# Altium PCB TuringSMD_FRONT.PcbDoc
Units mil, origin at the board's own origin, x right, y up, seen from the top; angles counter-clockwise.
Board outline 1181.1 x 5059.06 mil, 2 copper layers (Top Layer, Bottom Layer); 26 components, 85 nets, 86 pads, 19 vias.
Unrouted connection lines stored in the file: 1.
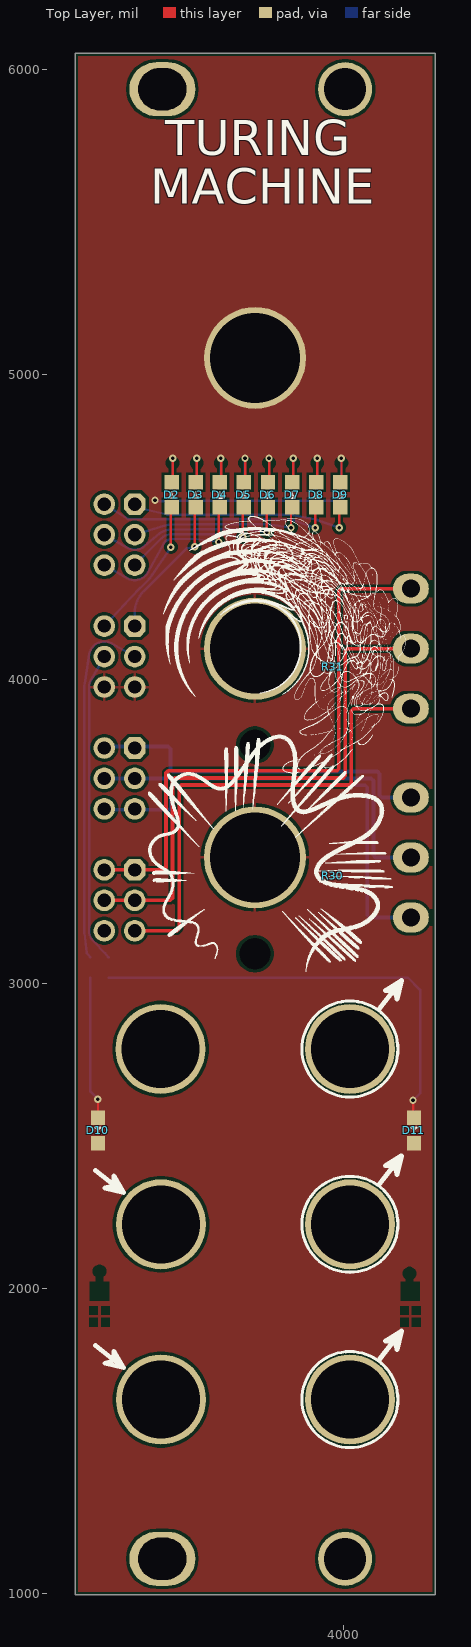
[diagram p0: Top Layer view]
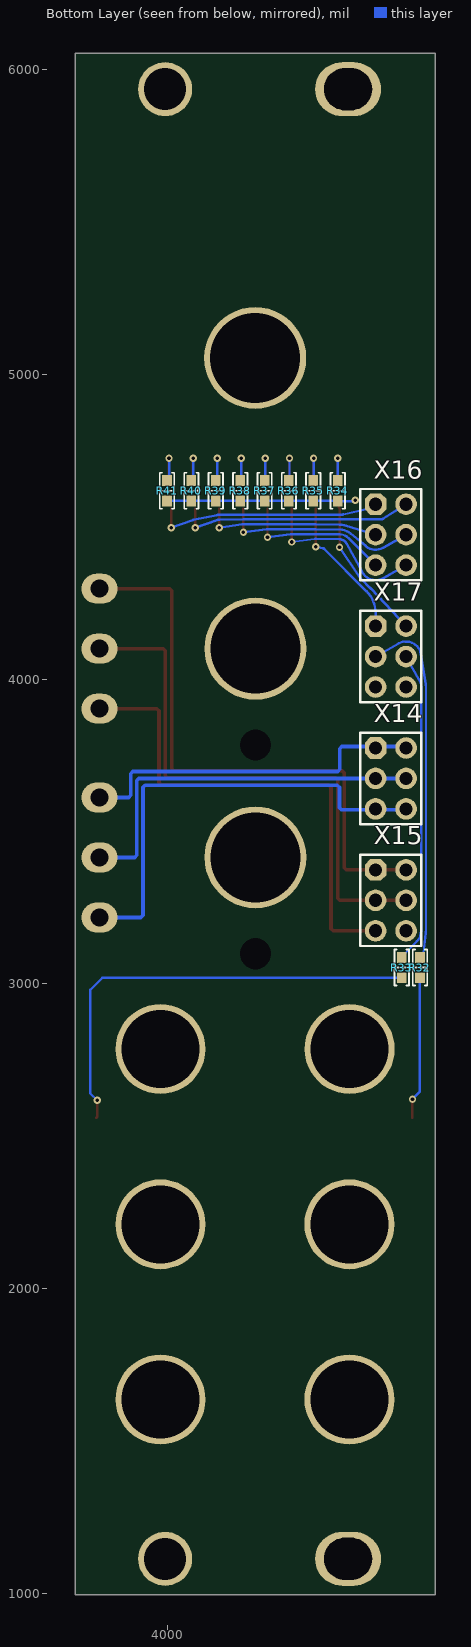
[diagram p1: Bottom Layer view, seen from below]
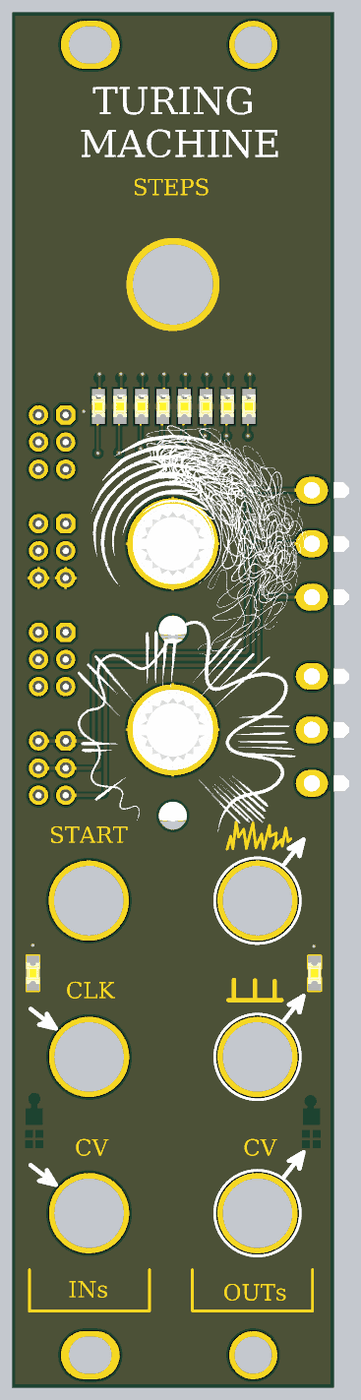
[diagram p2: 3D render of the assembled board from above, using the file's embedded part models]
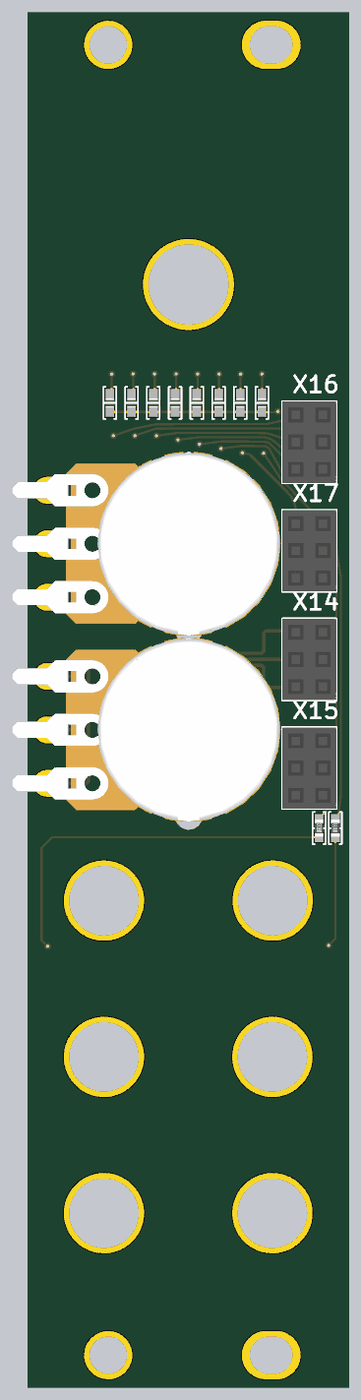
[diagram p3: 3D render of the assembled board from below, using the file's embedded part models]

## Layer stack, top to bottom
Top Solder: solder mask 0.4, Solder Resist, Dk 3.5
Top Layer: signal copper 1.4
Dielectric 1: dielectric 12.6, FR-4, Dk 4.8
Bottom Layer: signal copper 1.4
Bottom Solder: solder mask 0.4, Solder Resist, Dk 3.5

## Board outline
3120.25,995.25 4301.35,995.25 4301.35,6054.31 3120.25,6054.31

## Design rules (kind name [scope] priority, off if disabled: settings)
BoardOutlineClearance [All] p1: gap=10 ignorepadtopadclearanceinfootprint=FALSE except(0: Arc-SplitContinuation Track-SplitContinuation SMDPad-SplitContinuation THPad-SplitContinuation Via-SplitContinuation Fill-SplitContinuation Poly-SplitContinuation Region-SplitContinuation Text-SplitContinuation)
Clearance [All] p1: gap=10 ignorepadtopadclearanceinfootprint=FALSE except(8: Arc-Arc Arc-Track Arc-SMDPad Arc-Fill Arc-Poly Arc-Region Track-Track Track-SMDPad Track-Fill Track-Poly Track-Region SMDPad-SMDPad SMDPad-Fill SMDPad-Poly SMDPad-Region)
PolygonConnect [All] p1: thpad.connectstyle=Relief thpad.reliefconductorwidth=10 thpad.reliefentries=4 thpad.polygonreliefangle="90 Angle" thpad.airgapwidth=10 smdpad.connectstyle=Relief smdpad.reliefconductorwidth=10 smdpad.reliefentries=4 smdpad.polygonreliefangle="90 Angle" smdpad.airgapwidth=10 via.connectstyle=Direct via.reliefconductorwidth=10 via.reliefentries=4 via.polygonreliefangle="90 Angle" via.airgapwidth=10
RoutingVias [All] p1: holewidth=12 width=24 viastyle="Through Hole" minholewidth=12 minwidth=24 maxholewidth=12 maxwidth=24
SolderMaskExpansion [All] p1: expansion=4 istentingtop=FALSE
Width [All] p1: maxlimit=25 minlimit=8 preferedwidth=8
30 further rules are at their usual default settings.

## Components (designator, comment, footprint, x,y, rotation, side; value= is the part's Value field where it differs from the comment)
D2 "Yellow" "LED 0805_2012 YELLOW" 3436.54,4605 r90 top
D3 "Yellow" "LED 0805_2012 YELLOW" 3515.6,4605 r90 top
D4 "Yellow" "LED 0805_2012 YELLOW" 3594.67,4605 r90 top
D5 "Yellow" "LED 0805_2012 YELLOW" 3673.73,4605 r90 top
D6 "Yellow" "LED 0805_2012 YELLOW" 3752.8,4605 r90 top
D7 "Yellow" "LED 0805_2012 YELLOW" 3831.87,4605 r90 top
D8 "Yellow" "LED 0805_2012 YELLOW" 3910.93,4605 r90 top
D9 "Yellow" "LED 0805_2012 YELLOW" 3990,4605 r90 top
D10 "Yellow" "LED 0805_2012 YELLOW" 3195,2519 r270 top
D11 "Yellow" "LED 0805_2012 YELLOW" 4232,2519 r270 top
R30 "POT Ali" POT_ALI 3710,3415 r0 top
R31 "POT Ali" POT_ALI 3710,4100 r0 top
R32 "2.2 kOhms" "YAGEO RES 0603_1608" 3170,3053.46 r90 bottom
R33 "2.2 kOhms" "YAGEO RES 0603_1608" 3230,3053.46 r90 bottom
R34 "2.2 kOhms" "YAGEO RES 0603_1608" 3440,4618.46 r90 bottom
R35 "2.2 kOhms" "YAGEO RES 0603_1608" 3520,4618.46 r90 bottom
R36 "2.2 kOhms" "YAGEO RES 0603_1608" 3600,4618.46 r90 bottom
R37 "2.2 kOhms" "YAGEO RES 0603_1608" 3680,4618.46 r90 bottom
R38 "2.2 kOhms" "YAGEO RES 0603_1608" 3760,4618.46 r90 bottom
R39 "2.2 kOhms" "YAGEO RES 0603_1608" 3840,4618.46 r90 bottom
R40 "2.2 kOhms" "YAGEO RES 0603_1608" 3920,4618.46 r90 bottom
R41 "2.2 kOhms" "YAGEO RES 0603_1608" 4000,4618.46 r90 bottom
X14 "Connector, 6pin, 2.54mm, 500VAC, 3A" "CON: PBD-6" 3265.6,3674.27 r270 bottom
X15 "Connector, 6pin, 2.54mm, 500VAC, 3A" "CON: PBD-6" 3265.6,3274.27 r270 bottom
X16 "Connector, 6pin, 2.54mm, 500VAC, 3A" "CON: PBD-6" 3265.6,4474.27 r270 bottom
X17 "Connector, 6pin, 2.54mm, 500VAC, 3A" "CON: PBD-6" 3265.6,4074.27 r270 bottom

## Footprints (in the part's own frame and the unit in brackets; to place one, negate y for a bottom-side part, rotate by r counter-clockwise, add the part's x,y. Pads: shape width x height; smd on the part's side, far side on the other; paste and mask are expansions set on the pad)
"CON: PBD-6" [mm] "PBD-6"
  oct 1.8x1.8 hole 1.1: 1(-2.54,-1.27)
  round 1.8 hole 1.1: 2(-2.54,1.27) 3(0,-1.27) 4(0,1.27) 5(2.54,-1.27) 6(2.54,1.27)
  silkscreen extent -3.81,-2.54 3.81,2.54, body extent -3.81,-2.54 3.81,2.54, height 8.5
"LED 0805_2012 YELLOW" [mm] "Chip Diode, 2-Leads, Body 2.00x1.25mm, IPC Medium Density"
  rect 1.2x1.2 smd: 1(-1.05,0) 2(1.05,0)
  silkscreen extent -0.25,-0.25 0.25,0.25, body extent -1,-0.62 1,0.63, height 0.9
POT_ALI [mm] "cheap ali pot backward connection to pcb"
  round 1 hole 2.6: 4(0,-8.027)
  oval 3x2.5 hole 1.5: B(13,-5) T(13,5) W(13,0)
  round 8.5 hole 7.5: G(0,0)
  body extent -8.6,-8.59 16.5,8.6, height 14.5
"YAGEO RES 0603_1608" [mm] "Chip Resistor, 2-Leads, Body 1.60x0.80mm"
  rect 0.9x0.8 smd: 1(-0.85,0) 2(0.85,0)
  silkscreen extent -1.5,-0.6 1.5,0.6, body extent -0.8,-0.4 0.8,0.4, height 0.45

## Part data
D2 D3 D4 D5 D6 D7 D8 D9 D10 D11: library part SML-LX0805YC-TR, "LED YELLOW CLEAR SMD", Current - Test=20mA, Device Package="0805 (2012 Metric)", Lens Color=Colorless, Manufacturer="Lumex Opto/Components Inc.", Millicandela Rating=9mcd, Supplier Part Number 1=67-2192-1-ND, Voltage - Forward (Vf) (Typ)=2.1V, Color=Yellow, ComponentLink1Description=Datasheet, ComponentLink1URL=https://www.lumex.com/content/files/ProductAttachment/SML-LX0805YC-TR.pdf, ComponentLink2Description="DigiKey Link", ComponentLink2URL=https://www.digikey.com/en/products/detail/lumex-opto-components-inc/SML-LX0805YC-TR/515791, Configuration=Standard, Height (Max)=1.20mm, LastUpdated="6/3/2024 8:01:27 PM", Lens Size="1.40mm x 1.25mm", Lens Style="Rectangle with Flat Top", Lens Transparency=Clear, Lifecycle Status=Active, Minimum Order=1, Mounting Type="Surface Mount", Package / Case="0805 (2012 Metric)", Packaging=TapeAndReel, Part Number=SML-LX0805YC-TR, Part Status=Active, PartId=39, Price=0.04, Series=-, Size / Dimension="2.00mm L x 1.25mm W", Supplier 1=DigiKey, Viewing Angle=140°, Wavelength - Peak=585nm
R32 R33 R34 R35 R36 R37 R38 R39 R40 R41: library part AA0603FR-072K2L, "RES SMD 2.2K OHM 1% 1/10W 0603", Device Package="0603 (1608 Metric)", Manufacturer=Yageo, Operating Temperature="-55°C ~ 155°C", Power (Watts)="0.1W, 1/10W", Ratings=AEC-Q200, Supplier Device Package=0603, Supplier Part Number 1=13-AA0603FR-072K2LCT-ND, Temperature Coefficient=±150ppm/°C, Tolerance=±1%, ComponentLink1Description=Datasheet, ComponentLink1URL=https://www.yageo.com/upload/media/product/app/datasheet/rchip/pyu-aa_51_rohs_l.pdf, ComponentLink2Description="DigiKey Link", ComponentLink2URL=https://www.digikey.com/en/products/detail/yageo/AA0603FR-072K2L/5888997, Composition="Thick Film", Features="Anti-Sulfur, Automotive AEC-Q200, Moisture Resistant", Height - Seated (Max)="0.022\" (0.55mm)", LastUpdated="7/25/2024 9:18:54 AM", Lifecycle Status=Active, Minimum Order=1, Number of Terminations=2, Package / Case="0603 (1608 Metric)", Packaging=TapeAndReel, Part Number=AA0603FR-072K2L, PartId=86838, Price=0.01, Resistance="2.2 kOhms", Series=AA, Size / Dimension="0.063\" L x 0.031\" W (1.60mm x 0.80mm)", Supplier 1=DigiKey
X14 X15 X16 X17: library part PBD-6, CurrentMax=3A, Manufacturer=Connfly, VoltageMax=500VAC, CommentText="\"Разъем\"", helpurl=https://www.chipdip.ru/product/pbd-6, Multichannel=6pin, PartNumber=PBD-6, Pitch=2.54mm, TypeConnector=Connector, ValueManufacturerPartNumber="Connector, 6pin, 2.54mm, 500VAC, 3A"

## Free pads (board coordinates)
  round 295.28 hole 255.91: 4(3400.6,2786.32) 4(3401.74,1636) 4(3401.74,1636) 4(3401.74,2211.16) 4(4021.82,1636) 4(4021.82,2211.16) 4(4021.82,2786.32)
  oval 216.54x177.17 hole 137.8 slot 157.48 at 0 deg: 4(3406.08,1113.36) 4(3406.08,5936.19)
  round 334.65 hole 295.28: 4(3710.6,5054.27)
  round 177.17 hole 137.8: 4(4006.08,1113.36) 4(4006.08,5936.19)

## Via types
v1: diameter 24, hole 12, Top Layer to Bottom Layer, tented both sides, 19 vias

## Nets (pads, with @x,y where several pads share a name; then routed paths per layer and width w, separated by ;. In a path a pad name is that pad's centre, name@x,y a point inside that pad or via, vN(x,y) a via of type N, cw(c..) or ccw(c..) an arc to the next point about the centre after c; other vN are vias at no path point)
+9_1: 
+9_2: 
+12: 
+12_IDC: 
-12: 
-12_IDC: 
B1: D9.1 X16.1 | length 745.6
  Top Layer w8: v1(3986.57,4497.48) D9.1@3986.57,4560.23
  Bottom Layer w8: X16.1 3347.04,4558.21 3421.49,4540.61 ccw(c3424.25,4552.28) 3424.25,4540.28 3504.25,4540.28 3749.37,4540.28 cw(c3749.37,4482.28) 3749.97,4540.28 3828.84,4539.47 cw(c3828.44,4497.48) 3836.94,4538.61 3912.77,4522.94 cw(c3907.51,4497.48) 3916.05,4522.03 v1(3986.57,4497.48)
B2: D8.1 X16.2 | length 773.1
  Top Layer w8: v1(3907.51,4497.48) D8.1@3907.51,4560.23
  Bottom Layer w8: X16.2 3290.41,4527 ccw(c3297.89,4538.84) 3297.89,4524.84 3424.13,4524.28 ccw(c3424.25,4552.28) 3424.25,4524.28 3749.37,4524.28 cw(c3749.37,4482.28) 3749.8,4524.28 3828.7,4523.47 cw(c3828.44,4497.48) 3836.99,4522.03 v1(3907.51,4497.48)
B3: D7.1 X16.3 | length 581.2
  Top Layer w8: v1(3828.44,4497.48) D7.1@3828.44,4560.23
  Bottom Layer w8: X16.3 3412.27,4504.05 cw(c3434.06,4433.33) 3433.27,4507.33 3511.27,4508.28 cw(c3512.17,4434.28) 3512.17,4508.28 3749.37,4508.28 cw(c3749.37,4482.28) 3752.97,4508.03 v1(3828.44,4497.48)
B4: D6.1 X16.4 | length 645.8
  Top Layer w8: v1(3749.37,4482.28) D6.1@3749.37,4560.23
  Bottom Layer w8: X16.4 3291.17,4431.3 ccw(c3315.6,4474.27) 3347.34,4436.37 3396.83,4477.8 cw(c3434.06,4433.33) 3433.42,4491.33 3511.47,4492.28 cw(c3512.17,4434.28) 3512.17,4492.28 3670.31,4492.28 cw(c3670.31,4466.28) 3673.64,4492.07 v1(3749.37,4482.28)
B5: D5.1 X16.5 | length 489.4
  Top Layer w8: v1(3670.31,4466.28) D5.1@3670.31,4560.23
  Bottom Layer w8: X16.5 3404.41,4463.07 cw(c3434.06,4433.33) 3433.59,4475.33 3511.66,4476.28 cw(c3512.17,4434.28) 3512.17,4476.28 3591.24,4476.28 cw(c3591.24,4450.28) 3594.57,4476.07 v1(3670.31,4466.28)
B6: D4.1 X16.6 | length 569.7
  Top Layer w8: v1(3591.24,4450.28) D4.1@3591.24,4560.23
  Bottom Layer w8: X16.6 3291.17,4331.3 ccw(c3315.6,4374.27) 3358.94,4350.49 3411.27,4445.84 cw(c3434.06,4433.33) 3433.74,4459.33 3511.86,4460.28 cw(c3512.17,4434.28) 3515.51,4460.07 v1(3591.24,4450.28)
B7: D3.1 X17.1 | length 473.9
  Top Layer w8: v1(3512.17,4434.28) D3.1@3512.17,4560.23
  Bottom Layer w8: X17.1 3315.6,4217.68 cw(c3415.6,4217.68) 3344.89,4288.39 3484.24,4427.75 cw(c3489.89,4422.07) 3488.45,4429.94 v1(3512.17,4434.28)
B8: D2.1 X17.2 | length 472.1
  Top Layer w8: v1(3434.06,4433.33) 3433.11,4434.28 3433.11,4560.23 D2.1
  Bottom Layer w8: X17.2 3331.08,4297.13 cw(c3415.6,4217.68) 3333.63,4299.76 3361.87,4328 ccw(c3315.6,4374.27) 3369.93,4337.8 v1(3434.06,4433.33)
BUFFCLK1: 
BUFFCLK2: 
CHANGE_B: R31.B X15.5 X15.6 | length 1618.6
  Top Layer w12: X15.5 3454.83,3174.27 3461.86,3181.3 3461.86,3645.9 3468.89,3652.93 4019.43,3652.93 4026.46,3659.96 4026.46,3896.12 4033.49,3903.15 R31.B
CHANGE_T: R31.T X15.1 X15.2 | length 1912.3
  Top Layer w12: X15.2 X15.1 3411.03,3374.27 3418.06,3381.3 3418.06,3691.97 3425.09,3699 3977.89,3699 3984.92,3706.03 3984.92,4289.82 3991.95,4296.85 R31.T
CHANGE_W: R31.W X15.3 X15.4 | length 1815.5
  Top Layer w12: X15.4 X15.3 3432.5,3274.27 3439.53,3281.3 3439.53,3668.86 3446.56,3675.89 3999.14,3675.89 4006.17,3682.92 4006.17,4092.97 4013.2,4100 R31.W
CLK: R32.2 X17.3 | length 1183.6
  Bottom Layer w8: R32.2 3158.25,3100.65 3150.6,3166.75 cw(c3215.6,3174.27) 3150.17,3174.27 3150.17,3974.27 cw(c3215.6,3974.27) 3151.01,3984.74 3166.81,4082.18 cw(c3215.6,4074.27) 3240.04,4117.24 X17.3
G1: 
G2: 
G3: 
G4: 
G5: 
G6: 
G7: 
G8: 
GND: D10.2 D11.2 R30.G R31.G R34.1 R35.1 R36.1 R37.1 R38.1 R39.1 R40.1 R41.1 X17.5 X17.6 | length 619.6
  Bottom Layer w8: v1(3382,4587) 3384.99,4584.01 3439.01,4584.01 R34.1 R35.1 R36.1 R37.1 R39.1 3988.25,4585 R41.1
NetC1_1: 
NetC2_1: 
NetC2_2: 
NetC3_1: 
NetC3_2: 
NetC4_1: 
NetC5_2: 
NetC7_2: 
NetC8_2: 
NetC9_1: 
NetC10_2: 
NetC11_2: 
NetD1_1: 
NetD2_2: D2.2 R34.2 | length 147.1
  Top Layer w8: D2.2 3440.65,4650.46 v1@3440.65,4718.68
  Bottom Layer w8: R34.2 v1(3440,4725)
NetD3_2: D3.2 R35.2 | length 147.1
  Top Layer w8: D3.2 3519.72,4650.46 v1@3519.72,4718.68
  Bottom Layer w8: R35.2@3519.07,4651.93 v1(3519.07,4725)
NetD4_2: D4.2 R36.2 | length 147.1
  Top Layer w8: D4.2 3598.78,4650.46 v1@3598.78,4718.68
  Bottom Layer w8: R36.2@3598.13,4651.93 v1(3598.13,4725)
NetD5_2: D5.2 R37.2 | length 147.1
  Top Layer w8: D5.2 3677.85,4650.46 v1@3677.85,4718.68
  Bottom Layer w8: R37.2@3677.2,4651.93 v1(3677.2,4725)
NetD6_2: D6.2 R38.2 | length 147.1
  Top Layer w8: D6.2 3756.92,4650.46 v1@3756.92,4718.68
  Bottom Layer w8: R38.2@3756.27,4651.93 v1(3756.27,4725)
NetD7_2: D7.2 R39.2 | length 147.1
  Top Layer w8: D7.2 3835.98,4650.46 v1@3835.98,4718.68
  Bottom Layer w8: R39.2@3835.33,4651.93 v1(3835.33,4725)
NetD8_2: D8.2 R40.2 | length 147.1
  Top Layer w8: D8.2 3915.05,4650.46 v1@3915.05,4718.68
  Bottom Layer w8: R40.2@3914.4,4651.93 v1(3914.4,4725)
NetD9_2: D9.2 R41.2 | length 147.1
  Top Layer w8: D9.2 3994.12,4650.46 v1@3994.12,4718.68
  Bottom Layer w8: R41.2@3993.46,4651.93 v1(3993.46,4725)
NetD10_1: D10.1 R32.1 | length 470
  Top Layer w8: v1(3194.69,2621.88) 3195,2621.57 D10.1
  Bottom Layer w8: R32.1 3170,2646.57 v1(3194.69,2621.88)
NetD11_1: D11.1 R33.1 | length 1468.9
  Top Layer w8: v1(4229,2618) 4229,2563.34 D11.1
  Bottom Layer w8: R33.1 4212,3020 4251.88,2980.12 4251.88,2640.88 v1(4229,2618)
NetIC1_2: 
NetIC2_1: 
NetIC2_2: 
NetIC2_7: 
NetIC3_1: 
NetIC3_2: 
NetIC3_3: 
NetIC3_5: 
NetIC3_12: 
NetIC4_2: 
NetIC4_3: 
NetIC5_1: 
NetIC7_10: 
NetJ1_3: 
NetJ2_3: 
NetJ3_3: 
NetR3_2: 
NOISE: 
P1: 
P2: 
P3: 
P4: 
P5: 
P6: 
P7: 
P8: 
PULSE_OUT: R33.2 X17.4 | length 1023.3
  Bottom Layer w8: X17.4 3172.63,3998.7 ccw(c3215.6,3974.27) 3166.17,3974.27 3166.17,3174.27 ccw(c3215.6,3174.27) 3180.17,3139.8 3218.25,3100.65 R33.2
SCALE_B: R30.B X14.5 X14.6 | length 1507.9
  Bottom Layer w12: X14.6 3215.6,3571 3315.6,3571 3426.97,3571 3434,3578.03 3434,3644.97 3441.03,3652 4071.97,3652 4079,3644.97 4079,3225.18 4086.03,3218.15 R30.B
SCALE_T: R30.T X14.1 X14.2 | length 1161.6
  Bottom Layer w12: X14.2 3215.6,3779 3315.6,3779 3425.97,3779 3433,3771.97 3433,3704.03 3440.03,3697 4111.97,3697 4119,3689.97 4119,3618.88 4126.03,3611.85 R30.T
SCALE_W: R30.W X14.3 X14.4 | length 1257.2
  Bottom Layer w12: X14.4 X14.3 4091.97,3674.27 4099,3667.24 4099,3422.03 4106.03,3415 R30.W
STEP12: 
STEP16: 
WRITE_SW: 
pads on no net: R30.4 R31.4

## Polygon pours and split planes (outlines as drawn)
GND on Top Layer "NONET_L02_P-001" (solid, pour order 0): 3120,6056 3120,992 4304,992 4304,6056 4302,6056

## Silkscreen, mask and mechanical layers (free items; w line width, h text height)
Top Overlay:
  drawing of 123 lines, arcs and shapes, not listed
  text "TURING" at 3415.09,5681 h196.85
  text "MACHINE" at 3366,5523 h196.85
Top Solder:
  lines w10: 3182,1428 3182,1276 3624,1276 3624,1428 ; 3782,1428 3782,1276 4224,1276 4224,1428 ; 3910,2976 3923,3023 3931,2978 3943,3075 3952,3021 3971,3049 3981,2979 4005,3072 4016,2981 4037,3031 4043,2976 4066,3063 4067,3023 4091,3035 4089,3001 4080,2979 4110,3011 4113,2987 4126,3054 4134,3004 4145,3014
  lines w15.75: 3915.08,2420 4110.08,2420 ; 3935.08,2420 3935.08,2495 ; 4012.58,2420 4012.58,2492.5 ; 4085.08,2420 4085.08,2490
  text "STEPS" at 3562,5383 h118.11
  text "START" at 3255,2999 h118.11
  text "CLK" at 3316.05,2427 h118.11
  text "CV" at 3348.98,1848 h118.11
  text "CV" at 3969.05,1848 h118.11
  text "INs" at 3325.05,1326 h118.11
  text "OUTs" at 3895,1315 h118.11
Board Shape:
  the board outline again, w0.5
Mechanical 4:
  circle w0.5: c3710.6,5054.27 r127.95
  circle w0.5: c3400.6,2786.32 r127.95
  circle w0.5: c4021.82,2786.32 r127.95
  circle w0.5: c4021.82,2211.16 r127.95
  circle w0.5: c4021.82,1636 r127.95
  circle w0.5: c3401.74,1636 r127.95
  circle w0.5: c3401.74,2211.16 r127.95